# Altium PCB HLK-V20-KIT-V2.1.PcbDoc
Units mil, origin at the board's own origin, x right, y up, seen from the top; angles counter-clockwise.
Board outline 1181.1 x 1102.36 mil, 2 copper layers (Top Layer, Bottom Layer); 18 components, 58 nets, 96 pads, 45 vias.
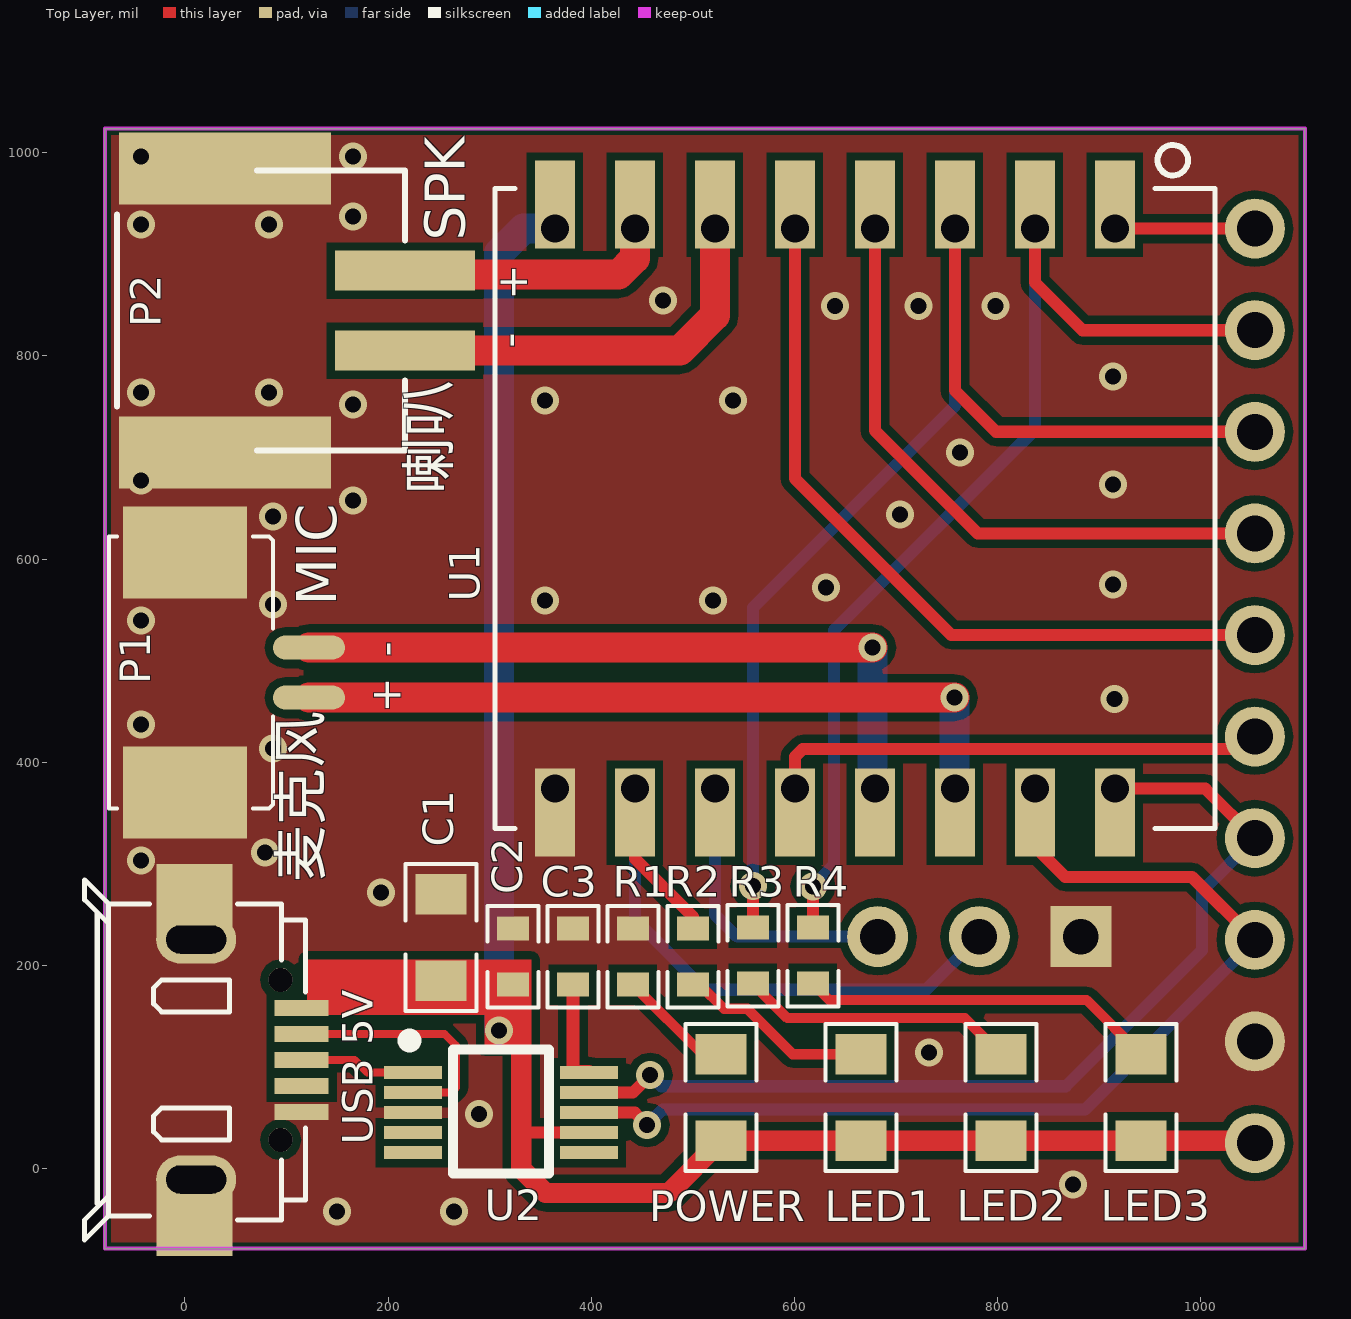
[diagram p0: Top Layer view]
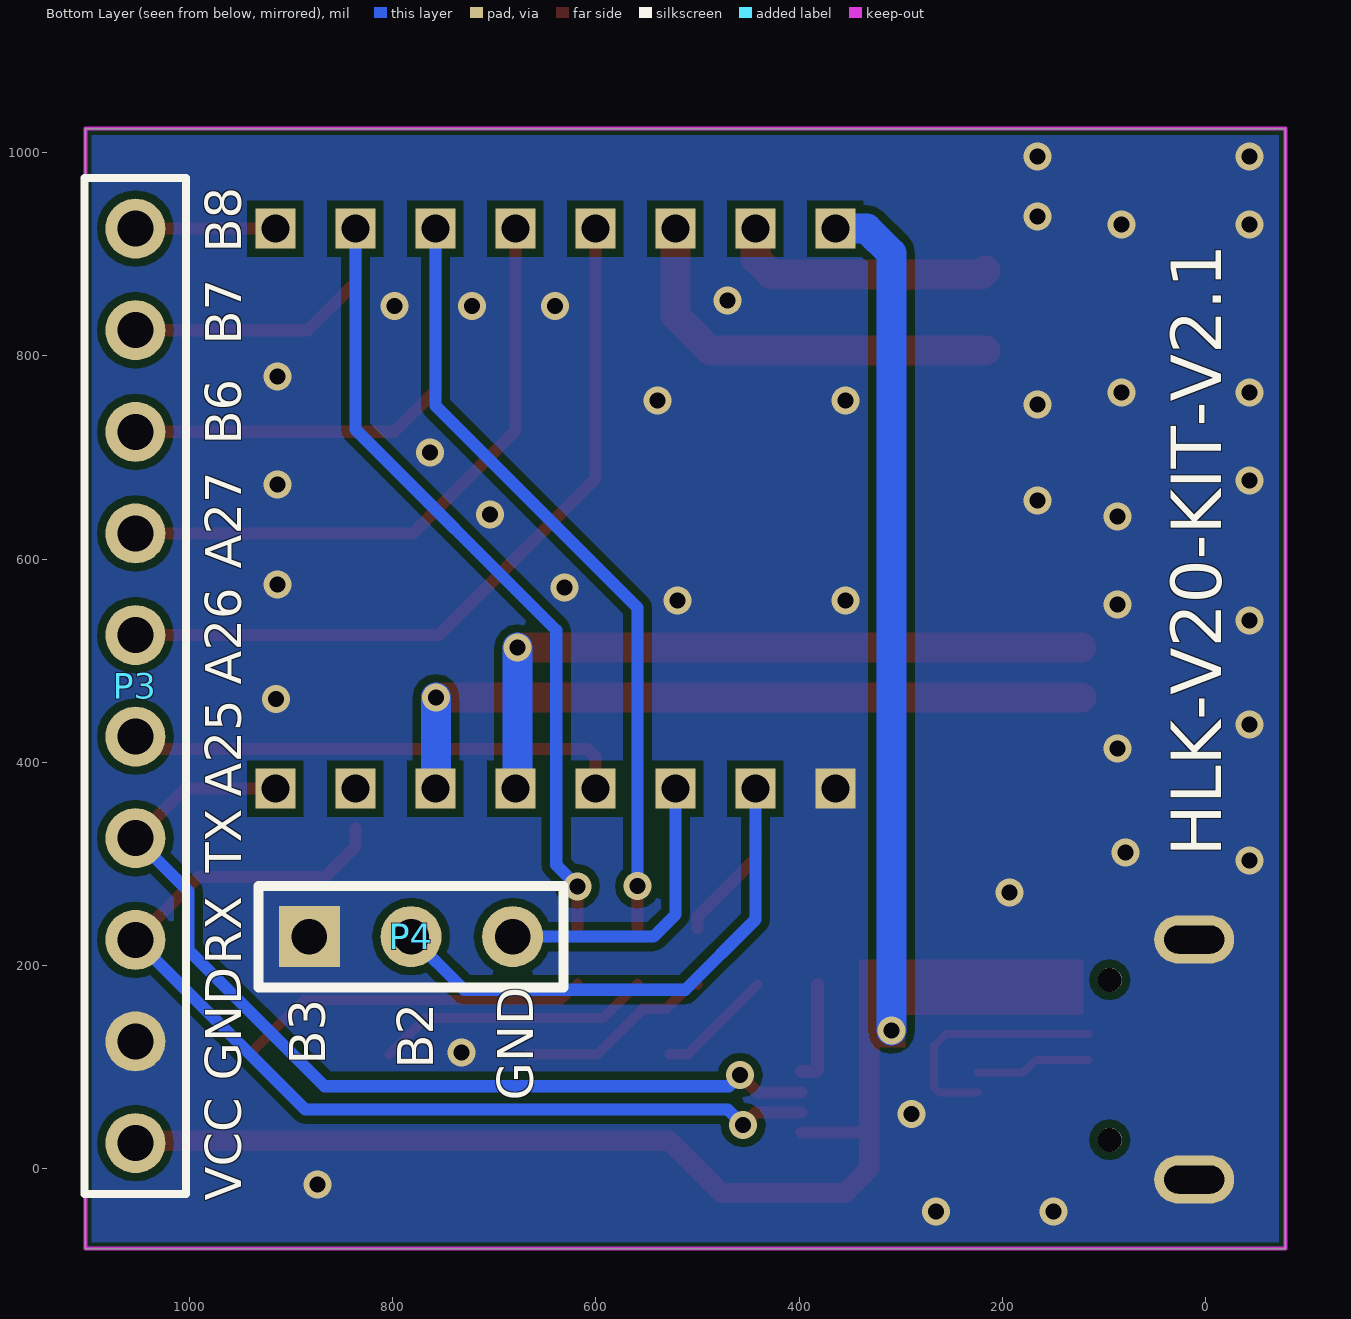
[diagram p1: Bottom Layer view, seen from below]

## Layer stack, top to bottom
Top Layer: signal copper 1.4
Dielectric: dielectric 12.6, FR-4, Dk 4.8
Bottom Layer: signal copper 1.4

## Board outline
-78.74,-78.74 -78.74,1023.62 1102.36,1023.62 1102.36,-78.74

## Design rules (kind name [scope] priority, off if disabled: settings)
Clearance Clearance_1 [OnLayer('Keep-Out Layer')] p1: gap=3.94
Clearance [All] p2: gap=7.87
PlaneConnect [All] p1: planeconnectstyle=Direct reliefexpansion=20 reliefentries=4 reliefconductorwidth=10 reliefairgap=10
PolygonConnect [All] p1: connectstyle=Direct reliefconductorwidth=10 reliefentries=4 polygonreliefangle="90 Angle"
RoutingVias [All] p1: holewidth=15.75 width=27.56 viastyle="Through Hole" minholewidth=15.75 minwidth=27.56 maxholewidth=15.75 maxwidth=27.56
SilkscreenOverComponentPads SilkToSolderMaskClearance [IsPad] p1: minsilkscreentomaskgap=10
SolderMaskExpansion [All] p1: expansion=4
TestPointUsage FabricationTestPointUsage [All] p1: valid=0 allowmultiple=FALSE
Testpoint FabricationTestpoint [(IsPad And (OnTopLayer Or OnBottomLayer))] p1: side=3 testpointundercomponent=TRUE minsize=40 maxsize=100 preferedsize=60 minholesize=0 maxholesize=40 preferedholesize=32 testpointgrid=1 style=297 order=0123456789
Width [All] p1: maxlimit=196.85 minlimit=7.09 preferedwidth=10
22 further rules are at their usual default settings.

## Classes and differential pairs
component class HLK-V01-KIT-V1.0: C1 C2 LED1 LED2 LED3 P1 POWER R1 R2 R3 R4 R10 R11 "USB 5V"

## Components (designator, comment, footprint, x,y, rotation, side; value= is the part's Value field where it differs from the comment)
C1 "4.7UF" 0805R 251.97,270.04 r270 top
C2 "0.1UF" 0603 322.83,208.66 r270 top
C3 "0.1UF" 0603 381.89,208.66 r270 top
LED1 "LED2" 0805R 665.35,27.56 r90 top
LED2 "LED2" 0805R 803.15,27.56 r90 top
LED3 "LED3" 0805R 940.94,27.56 r90 top
P1 "1.25*2_SMT" 1.25-2P 122.05,488.19 r90 top locked
P2 "2.0*2_SMT" PH2.0-2P 216.54,805.12 r90 top
P3 "2.54*10" HDR1X10 1053.15,925.2 r270 bottom locked
P4 "2.54*3" SIP3 881.89,228.35 r180 bottom
POWER "LED" 0805R 527.56,27.56 r90 top
R1 "1K" 0603 440.94,208.66 r90 top
R2 "1K" 0603 500,208.66 r90 top
R3 "1K" 0603 559.06,209.66 r90 top (schematic designator R4)
R4 "1K" 0603 618.11,209.66 r90 top (schematic designator R10)
U1 "Comment" HLK-V20 915.35,964.57 r270 top
U2 "CH340E" MSOP-10 311.02,55.12 r270 top (schematic designator U1)
"USB 5V" "USB" usb 7.87,106.3 r270 top locked (schematic designator USB1)

## Footprints (in the part's own frame and the unit in brackets; to place one, negate y for a bottom-side part, rotate by r counter-clockwise, add the part's x,y. Pads: shape width x height; smd on the part's side, far side on the other; paste and mask are expansions set on the pad)
1.25-2P [mm]
  oval 0.6x1.8 smd: 1(0.625,0) 2(-0.625,0)
  rect 2.3x3.1 smd: 3(-3,3.1) 4(3,3.1)
  silkscreen extent -3.4,0.9 3.4,5
0603 [mm]
  rect 0.6x0.8 smd: 1(-0.7,0) 2(0.7,0)
  silkscreen extent -1.27,-0.64 1.27,0.64
0805R [mil]
  rect 40x50 smd: 1(0,0) 2(85,0)
  silkscreen extent -30,-35 115,35, body extent 4,-25 83,25, height 22
HDR1X10 [mm]
  round 1.5 hole 0.9: 1(0,0) 2(2.54,0) 3(5.08,0) 4(7.62,0) 5(10.16,0) 6(12.7,0) 7(15.24,0) 8(17.78,0) 9(20.32,0) 10(22.86,0)
  silkscreen extent -1.27,-1.27 24.13,1.27
HLK-V20 [mm]
  rect 1.4x1 smd: 1(0,0) 2(0,-2) 3(0,-4) 4(0,-6) 5(0,-8) 6(0,-10) 7(0,-12) 8(0,-14) 9(16,-14) 10(16,-12) 11(16,-10) 12(16,-8) 13(16,-6) 14(16,-4) 15(16,-2) 16(16,0)
  rect 1x1 hole 0.7: 1(1,0) 2(1,-2) 3(1,-4) 4(1,-6) 5(1,-8) 6(1,-10) 7(1,-12) 8(1,-14) 9(15,-14) 10(15,-12) 11(15,-10) 12(15,-8) 13(15,-6) 14(15,-4) 15(15,-2) 16(15,0)
  silkscreen extent -1.09,-15.5 16,2.5
MSOP-10 [mm]
  rect 0.33x1.45 smd: 1(-1,-2.2) 2(-0.5,-2.2) 3(0,-2.2) 4(0.5,-2.2) 5(1,-2.2) 6(1,2.2) 7(0.5,2.2) 8(0,2.2) 9(-0.5,2.2) 10(-1,2.2)
  silkscreen extent -1.95,-2.44 1.53,1.2
PH2.0-2P [mm]
  rect 1x3.5 smd: 1(0,0) 2(2,0)
  rect 1.8x5.3 smd: 3(4.55,4.5) 4(-2.55,4.5)
  silkscreen extent -2.5,0 4.5,7.2
SIP3 [mil]
  rect 60x60 hole 35: 1(0,0)
  round 60 hole 35: 2(100,0) 3(200,0)
  silkscreen extent -50,-50 250,50
usb [mm]
  oval 1.2x2 hole 0.7 slot 1.5 at 90 deg: 1(-3.028,0.081) 1(2.972,0.081)
  rect 0.4x1.35 smd: 1(1.28,2.719) 2(0.63,2.719) 3(-0.02,2.719) 4(-0.67,2.719) 5(-1.32,2.719)
  round 0.6 hole 0.6: 6(1.98,2.194) 9(-2.02,2.194)
  rect 1.8x1.9 smd: 7(3.98,0.044) 8(-4.02,0.044)
  silkscreen extent -4.52,-2.71 4.48,2.82

## Part data
C1 C2 C3: library part CAP, "Capacitor"
LED1 LED2 LED3: library part LED
P1: library part Component_1
R1 R2 R3 R4: library part RES1
"USB 5V": library part USB-B

## Via types
v1: diameter 27.56, hole 15.75, Top Layer to Bottom Layer, tented both sides, 45 vias

## Nets (pads, with @x,y where several pads share a name; then routed paths per layer and width w, separated by ;. In a path a pad name is that pad's centre, name@x,y a point inside that pad or via, vN(x,y) a via of type N, cw(c..) or ccw(c..) an arc to the next point about the centre after c; other vN are vias at no path point)
3.3V: 
5V: "USB 5V.5" C1.2 C2.2 LED1.1 LED2.1 LED3.1 P3.10 POWER.1 U1.8 U2.7 | length 1943.7
  Top Layer w10: 333,54 333,164
  Top Layer w12: 333,35.43 U2.7
  Top Layer w20: C2.2 331,172.94 331,0 355,-24 476,-24 POWER.1 LED1.1 LED2.1 LED3.1 1050.79,27.56 P3.10
  Bottom Layer w29.53: v1(309,136) 309,901 333.2,925.2 U1.8@364.17,925.2
ACE_N: 
ACE_P: 
CTS: U2.5
DM: "USB 5V.4" U2.2 | length 242.7
  Top Layer w7.87: 114.91,132.68 255.32,132.68 267,121 267,80 261.8,74.8 U2.2
DP: "USB 5V.3" U2.1 | length 114.7
  Top Layer w7.87: 114.91,107.09 166.91,107.09 179.51,94.49 U2.1
GND: "USB 5V.1" "USB 5V.7" "USB 5V.8" C1.1 C2.1 C3.1 P1.3 P1.4 P2.3 P2.4 P3.9 P4.1 R1.2 U1.9 U2.3
  other v1: 149.61,-42.22 265,-42 874.02,-15.75 289.32,54 732.28,114.17 192.91,271.65 -43.31,303.15 78.74,311.02 86.61,413.39 -43.31,437.01 915,462 -43.31,539.37 86.61,555.12 354.33,559.06 519.68,559.06 631,572 913.39,574.8 86.61,641.73 704,644 165.35,657.48 913.39,673.23 -43.31,677.17 763,705 165.35,751.97 354.33,755.91 539.37,755.91 -43.31,763.78 82.68,763.78 913.39,779.53 640,849 722,849 798,849 470.47,854.33 -43.31,929.13 82.68,929.13 165.35,937.01 -43.31,996.06 165.35,996.06
IO9: 
IO10: 
IO11: 
MIC0_N: 
MIC0_P: 
MIC+: P1.2 U1.14 | length 725.1
  Top Layer w29.53: P1.2 v1(757.29,463.58)
  Bottom Layer w29.53: v1(757.29,463.58) 757.29,374.6 U1.14@757.87,374.02
MIC-: P1.1 U1.13 | length 694.6
  Top Layer w29.53: P1.1 v1(676.93,512.8)
  Bottom Layer w29.53: v1(676.93,512.8) 676.93,376.22 U1.13@679.13,374.02
NetC3_2: C3.2 U2.10 | length 100.3
  Top Layer w12.99: C3.2 381.89,97.11 383.33,95.67 U2.10@397.64,95.67
NetCHRX_1: 
NetCHTX_1: 
NetLED1_2: LED1.2 R2.1 | length 193.7
  Top Layer w10: R2.1 506.9,181.1 530.59,157.41 553.45,157.41 598.31,112.56 LED1.2
NetLED2_2: LED2.2 R3.1 | length 272.9
  Top Layer w10: R3.1 593.03,148.13 767.58,148.13 LED2.2
NetLED3_2: LED3.2 R4.1 | length 351.6
  Top Layer w10: R4.1 634.21,166 887.5,166 LED3.2
NetON/OFF_2: 
NetP1_1: 
NetP1_2: 
NetP2_1: 
NetP2_2: 
NetPOWER_2: POWER.2 R1.1 | length 115
  Top Layer w10: R1.1 509.49,112.56 POWER.2
NetR3_1: 
NetR10_2: 
NetR12_1: 
NetRST_2: 
PA_N: 
PA_P: 
PWM0: 
RTS: U2.4
RX0_CH340E: 
RXD: 
SIO0: 
SIO1: 
SPK+: P2.2 U1.7 | length 263.9
  Top Layer w29.53: P2.2 220.39,880 427,880 442.91,895.91 U1.7@442.91,925.2
SPK-: P2.1 U1.6 | length 405
  Top Layer w29.53: P2.1 487.12,805.12 521.65,839.65 U1.6@521.65,925.2
TCK/IO4: 
TDI/IO7: 
TDO/IO6: 
TMS/IO5: 
TX0_CH340E: 
TXD: 
UART_RX: P3.8 U1.15 U2.8 | length 1071.6
  Top Layer w12: U2.8 442.88,55.12 v1(455,43) ; U1.15@836.61,334.65 836.61,316.93 866.54,287 917.32,287 ; 980.72,287 917.32,287 ; P3.8 991.35,287 917.32,287
  Bottom Layer w12: v1(455,43) 470.13,58.13 886.08,58.13 P3.8
UART_TX: P3.7 U1.16 U2.9 | length 965.6
  Top Layer w12: U2.9 440.8,74.8 v1(458,92) ; U1.16@915.35,374.02 1004.33,374.02 P3.7
  Bottom Layer w12: v1(458,92) 469,81 867,81 1001,215 1001,267.84 1001,273.05 P3.7 P3.7@1053.15,319.99
US_GPIO_B2: P4.2 R2.2 U1.10 | length 640.3
  Top Layer w12: U1.10@442.91,334.65 442.91,305.09 500,248 R2.2
  Bottom Layer w12: U1.10@442.91,374.02 442.91,245.09 512,176 729.54,176 P4.2
US_GPIO_B3: P4.3 U1.11 | length 293.2
  Bottom Layer w12: U1.11@521.65,374.02 521.65,250 543.31,228.35 P4.3
US_GPIO_B6: P3.3 R3.2 U1.3 | length 1241.9
  Top Layer w12: R3.2 v1(559.06,277.94) ; U1.3@757.87,925.2 757.87,765.75 798.43,725.2 P3.3
  Bottom Layer w12: v1(559.06,277.94) 559.06,552.06 757.87,750.87 U1.3@757.87,925.2
US_GPIO_B7: P3.2 R4.2 U1.2 | length 1067.6
  Top Layer w12: R4.2 v1(618.11,277.83) ; U1.2@836.61,925.2 836.61,872.05 883.46,825.2 P3.2
  Bottom Layer w12: v1(618.11,277.83) 639,298.72 639,530 836.61,727.61 U1.2@836.61,925.2
US_GPIO_B8: P3.1 U1.1 | length 137.8
  Top Layer w12: U1.1@915.35,925.2 P3.1
US_SPIM_CLK: P3.5 U1.5 | length 762.6
  Top Layer w12: U1.5@600.39,925.2 600.39,679.13 740.06,539.46 754.33,525.2 P3.5
US_SPIM_MISO: P3.6 U1.12 | length 499.4
  Top Layer w12: U1.12@600.39,374.02 600.39,405.39 608.13,413.13 1053.15,413.13 P3.6
US_SPIM_MOSI: P3.4 U1.4 | length 614.7
  Top Layer w12: U1.4@679.13,925.2 679.13,752.87 679.13,726.38 780.31,625.2 P3.4
VMIC: 
pads on no net: "USB 5V.2" "USB 5V.6" "USB 5V.9" U2.6

## Polygon pours and split planes (outlines as drawn)
GND on Top Layer "MidLayer1-No Net" (solid, remove dead copper, pour order 4): -78.74,-78.74 1102.36,-78.74 1102.36,1023.62 -78.74,1023.62
GND on Bottom Layer "MidLayer1-No Net" (solid, remove dead copper, pour order 6): -78.74,-78.74 1102.36,-78.74 1102.36,1023.62 -78.74,1023.62

## Keep-outs
Keep-Out Layer:
  the board outline again, w3.94

## Other copper
Top Layer:
  rectangle net 5V: 295,119 341,151
  rectangle net 5V: 120,151 341,206

## Silkscreen, mask and mechanical layers (free items; w line width, h text height)
Top Overlay:
  text "SPK" at 275.59,913.39 h39.37 r90
  text "+" at 311.02,889.76 h30 r270
  text "-" at 311.02,822.83 h30 r270
  text "喇叭" at 273,664 h70 r90
  text "MIC" at 149,554 h39.37 r90
  text "-" at 212.6,503.94 h30 r90
  text "+" at 212.6,448.82 h30 r90
  text "麦克风" at 147,282 h70 r90
Bottom Overlay:
  text "B8" at 948.82,901.57 h35.43 r270
  text "B7" at 948.82,811.02 h35.43 r270
  text "B6" at 948.82,712.6 h35.43 r270
  text "A27" at 948.82,590.55 h35.43 r270
  text "A26" at 948.82,476.38 h35.43 r270
  text "A25" at 948.82,366.14 h35.43 r270
  text "HLK-V20-KIT-V2.1" at -15.75,307.09 h50 r270
  text "TX" at 948.82,291.34 h35.43 r270
  text "RX" at 948.82,200.79 h35.43 r270
  text "B3" at 866.14,102.36 h35.43 r270
  text "B2" at 759.84,98.43 h35.43 r270
  text "GND" at 948.82,86.61 h35.43 r270
  text "GND" at 661.42,66.93 h35.43 r270
  text "VCC" at 948.82,-31.5 h35.43 r270